# Altium PCB DB31.PcbDoc (part 3 of 8)
Units mil, origin at the board's own origin, x right, y up, seen from the top; angles counter-clockwise.
Board outline 3236.22 x 4456.69 mil, 8 copper layers (Top Layer, MidLayer1, MidLayer2, GND-Layer5, MidLayer3, VCC, MidLayer4, Bottom Layer), stack 61.8 mil thick; 226 components, 469 nets, 1815 pads, 1562 vias.
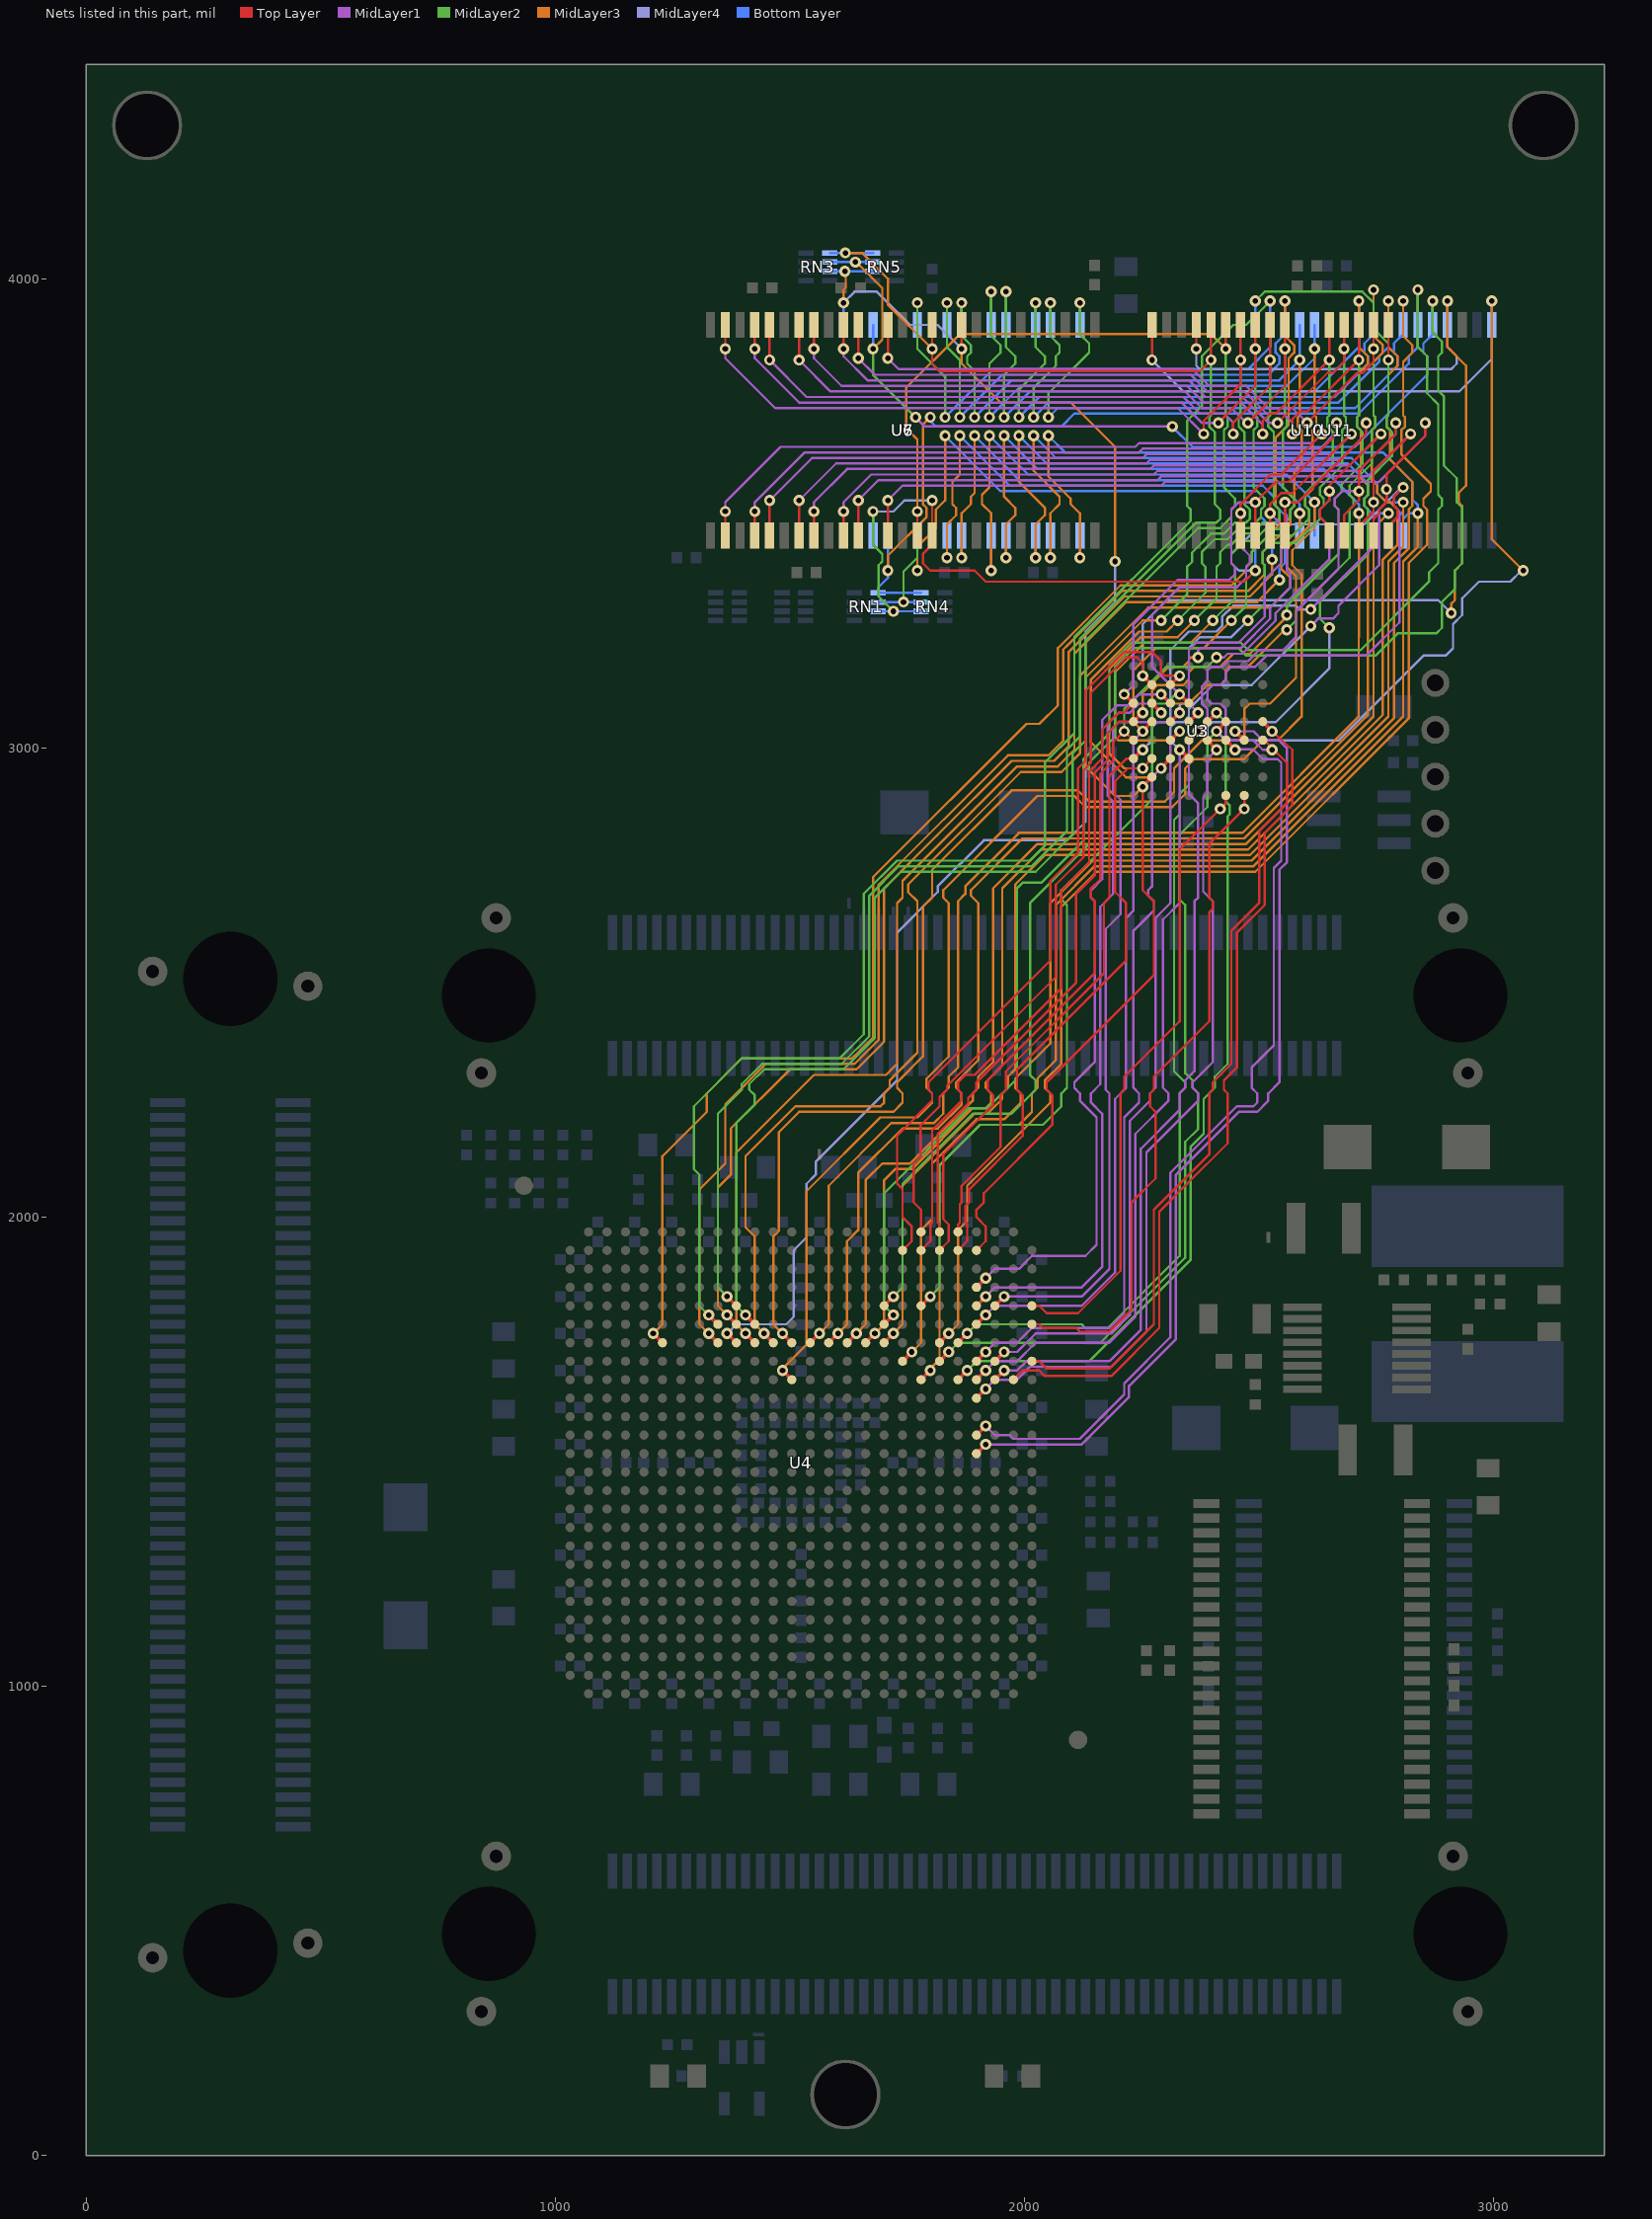
[diagram p9: the nets of this part, all layers, seen from the top]

## Via types
v1: diameter 23.62, hole 11.81, Top Layer to Bottom Layer, 947 vias
v2: diameter 23.62, hole 11.81, Top Layer to Bottom Layer, tented both sides, 476 vias
v3: diameter 27.56, hole 15.75, Top Layer to Bottom Layer, 138 vias
v4: diameter 23.62, hole 11.81, Top Layer to Bottom Layer, tented top, 1 vias

## Nets (pads, with @x,y where several pads share a name; then routed paths per layer and width w, separated by ;. In a path a pad name is that pad's centre, name@x,y a point inside that pad or via, vN(x,y) a via of type N, cw(c..) or ccw(c..) an arc to the next point about the centre after c; other vN are vias at no path point) (continued)
BUS_A19: U3.C4 U4.H21 U10.44 U11.44 | length 4321.2
  Top Layer w5: v2(2271.65,3826.77) U10.44@2271.65,3901.57
  Top Layer w7.87: U4.H21@1818.9,1692.91 v1(1838.59,1712.6) ; v1(2409.45,3035.43) U3.C4@2429.13,3056.1
  MidLayer2 w5: v1(1838.59,1712.6) 1858.27,1732.28 2078.74,1732.28 2090.55,1732.28 2161.42,1732.28 2342.52,1913.39 2342.52,2160.43 2370.08,2187.99 2370.08,2263.78 2358.27,2275.59 2358.27,2291.34 2342.52,2307.09 2342.52,2665.35 2330.71,2677.17 2330.71,2814.96 2389.76,2874.02 2389.76,3015.75 v1(2409.45,3035.43)
  MidLayer3 w5: v2(2996.06,3952.76) 2996.06,3633.86 2996.06,3444.88 v1(3062.99,3377.95)
  MidLayer4 w5: v2(2271.65,3826.77) 2338.58,3759.84 2926.67,3759.84 2996.06,3829.23 v2(2996.06,3952.76) ; v1(2409.45,3035.43) 2429.13,3015.75 2669.29,3015.75 2850.39,3196.85 2897.64,3196.85 2913.39,3212.6 2913.39,3263.78 2933.07,3283.46 2933.07,3318.9 2968.5,3354.33 3035.43,3354.33 3059.06,3377.95 v1(3062.99,3377.95)
  Bottom Layer w5: U11.44@2996.06,3901.57 v2(2996.06,3952.76)
BUS_A20: U3.D5 U4.K23 U10.28 U11.28 | length 3419.2
  Top Layer w5: v2(2775.59,3826.77) U10.28@2775.59,3901.57
  Top Layer w7.87: U4.K23@1897.64,1614.17 v1(1917.33,1633.86) ; U3.D5@2389.76,3016.73 v1(2409.45,2996.06)
  MidLayer1 w5: v1(1917.33,1633.86) 1937.01,1653.54 1984.25,1653.54 2011.81,1681.1 2078.74,1681.1 2090.55,1681.1 2185.04,1681.1 2259.84,1755.91 2259.84,2137.8 2370.08,2248.03 2370.08,2263.78 2358.27,2275.59 2358.27,2287.4 2401.57,2330.71 2401.57,2673.23 2380.91,2693.9 2380.91,2894.69 2389.76,2903.54 2389.76,2976.38 v1(2409.45,2996.06)
  MidLayer2 w5: v2(2492.13,3952.76) 2511.81,3972.44 2720.47,3972.44 2744.09,3948.82 2744.09,3893.7 2775.59,3862.21 v2(2775.59,3826.77) 2775.59,3708.66 2771.65,3704.72 2771.65,3685.04 2783.46,3673.23 2783.46,3622.05 2732.28,3570.87 2732.28,3539.37 2724.41,3531.5 2724.41,3515.75 2732.28,3507.87 2732.28,3413.39 2629.92,3311.02 2629.92,3275.59 v1(2649.61,3255.91)
  MidLayer4 w5: v1(2409.45,2996.06) 2389.76,3015.75 2389.76,3043.31 2401.57,3055.12 2535.43,3055.12 2649.61,3169.29 v1(2649.61,3255.91)
  Bottom Layer w5: U11.28@2492.13,3901.57 v2(2492.13,3952.76)
BUS_A21: U3.D4 U4.J22 | length 1840.2
  Top Layer w7.87: U4.J22@1858.27,1653.54 v1(1877.96,1673.23) ; U3.D4@2389.76,3056.1 v1(2409.45,3074.8)
  MidLayer2 w5: v1(1877.96,1673.23) 1897.64,1692.91 2078.74,1692.91 2090.55,1692.91 2137.8,1692.91 2354.33,1909.45 2354.33,2150.59 2381.89,2178.15 2381.89,2251.97 2405.51,2275.59 2405.51,2299.21 2433.07,2326.77 2433.07,2749.01 2433.07,2854.33 2437.01,2858.27 2437.01,2877.95 2429.13,2885.83 2429.13,2909.45 2429.13,3055.12 v1(2409.45,3074.8)
BUS_A22: U3.C5 U4.M23 | length 2028.4
  Top Layer w7.87: U4.M23@1897.64,1535.43 v1(1917.33,1555.12) ; U3.C5@2429.13,3016.73 v1@2448.82,2997.05
  MidLayer1 w5: v1(1917.33,1555.12) 1937.01,1535.43 1968.5,1535.43 1976.38,1527.56 2078.74,1527.56 2090.55,1527.56 2118.11,1527.56 2212.6,1622.05 2212.6,1645.67 2311.02,1744.09 2311.02,2094.49 2452.76,2236.22 2488.19,2236.22 2496.06,2244.09 2496.06,2263.78 2484.25,2275.59 2484.25,2318.9 2531.5,2366.14 2531.5,2744.09 2547.24,2759.84 2547.24,2968.5 2539.37,2976.38 2507.87,2976.38 2487.2,2997.05 v1@2448.82,2997.05
  Bottom Layer w5: v1@2447.83,2997.05 v1@2448.82,2997.05
  other v1: 2448.82,2996.06
BUS_A23: U3.B8 U4.F26 | length 1465
  Top Layer w5: U4.F26@2015.75,1771.65 2031.5,1771.65 2039.37,1763.78 2078.74,1763.78 2102.36,1763.78 2110.24,1763.78 2118.11,1755.91 2181.1,1755.91 2228.35,1803.15 2228.35,2031.5 2279.53,2082.68 2279.53,2224.41 2267.72,2236.22 2267.72,2263.78 2275.59,2271.65 2275.59,2299.21 2393.7,2417.32 2393.7,2649.61 2401.57,2657.48 2401.57,2673.23 2393.7,2681.1 2393.7,2731.56 ; 2393.7,2716.54 2393.7,2795.28 v1(2468.51,2870.08) U3.B8@2468.5,2898.62
BUS_A24: U3.C8 U4.E26 | length 1338.8
  Top Layer w5: U4.E26@2015.75,1811.02 2031.5,1811.02 2047.24,1795.28 2078.74,1795.28 2090.06,1795.28 2114.17,1795.28 2204.72,1885.83 2204.72,2263.78 2212.6,2271.65 2212.6,2299.21 2330.71,2417.32 2330.71,2783.46 v1(2417.32,2870.08) 2429.14,2881.89 U3.C8@2429.13,2898.62
BUS_D0: U3.E3 U4.E20 U6.2 U10.7 | length 3960.5
  Top Layer w5: U6.2@1362.21,3452.76 v2(1362.2,3503.93) ; U10.7@2460.63,3452.76 v1(2460.63,3500) 2460.63,3519.69 2523.62,3582.68 2547.24,3582.68 v2(2633.86,3669.29)
  Top Layer w7.87: U4.E20@1779.53,1811.02 v1(1799.21,1830.71) ; v1(2330.71,3114.17) U3.E3@2350.4,3095.48
  MidLayer1 w5: v2(1362.2,3503.93) 1362.2,3523.62 1480.31,3641.73 2236.22,3641.73 2244.09,3649.61 2614.17,3649.61 v2(2633.86,3669.29) ; v1(2330.71,3114.17) 2271.65,3173.23 2271.65,3283.46 2330.71,3342.52 2452.76,3342.52 2472.44,3362.2 2472.44,3385.83 2480.31,3393.7 2480.31,3409.45 2460.63,3429.13 v1(2460.63,3500)
  MidLayer2 w5: v1(1799.21,1830.71) 1818.9,1850.39 1818.9,2031.5 1818.9,2039.37 1818.9,2110.24 1905.51,2196.85 2039.37,2196.85 2078.74,2236.22 2078.74,2263.78 2090.55,2275.59 2090.55,2665.35 2078.74,2677.17 2078.74,2696.85 2094.49,2712.6 ; 2084.64,2702.76 2271.65,2889.77 2271.65,3086.61 2279.53,3094.49 2302.17,3094.49 2321.85,3114.17 v1(2330.71,3114.17)
BUS_D1: U3.H3 U4.B20 U6.4 U10.8 | length 3743.3
  Top Layer w5: U6.4@1425.2,3452.76 v2(1425.19,3503.93) ; U4.B20@1779.53,1929.13 1799.21,1948.82 1799.21,1984.25 1803.15,1988.19 1803.15,2031.5 1803.15,2039.37 1803.15,2185.04 1866.14,2248.03 1866.14,2263.78 1858.27,2271.65 1858.27,2287.4 1874.02,2303.15 1893.7,2303.15 2078.74,2488.19 2078.74,2696.85 2137.8,2755.91 2137.8,2949.54 2165.35,2977.1 2165.35,3039.37 2201.28,3075.3 2212.1,3075.3 U3.H3@2232.29,3095.48 ; U10.8@2492.13,3452.76 v1(2492.13,3523.62) 2535.43,3566.93 2562.99,3566.93 2665.35,3669.29 v2(2665.35,3692.91)
  Top Layer w7.87: v1(2212.6,3114.17) U3.H3@2232.29,3095.48
  MidLayer1 w5: v2(1425.19,3503.93) 1425.19,3523.62 1531.5,3629.92 2244.09,3629.92 2251.97,3637.8 2629.92,3637.8 2665.35,3673.23 v2(2665.35,3692.91) ; v1(2212.6,3114.17) 2232.28,3133.86 2232.28,3263.78 2326.77,3358.27 2437.01,3358.27 2448.82,3370.08 2448.82,3385.83 2440.94,3393.7 2440.94,3507.87 2456.69,3523.62 v1(2492.13,3523.62)
BUS_D2: U3.E4 U4.G22 U6.5 U10.9 | length 4029.6
  Top Layer w5: U6.5@1456.69,3452.76 v2(1456.69,3527.55) ; U10.9@2523.62,3452.76 v1(2523.62,3500) 2523.62,3519.69 2547.24,3543.31 2570.87,3543.31 v2(2696.85,3669.29)
  Top Layer w7.87: U4.G22@1858.27,1732.28 v1(1877.95,1751.97) ; U3.E4@2350.39,3056.1 v1(2370.08,3074.81)
  MidLayer1 w5: v2(1456.69,3527.55) 1547.24,3618.11 2251.97,3618.11 2259.84,3625.98 2653.54,3625.98 v2(2696.85,3669.29) ; v1(2370.08,3074.81) 2350.39,3094.5 2350.39,3208.66 2366.14,3224.41 2456.69,3224.41 2511.81,3279.53 2511.81,3358.27 2547.24,3393.7 2547.24,3476.38 v1(2523.62,3500)
  MidLayer2 w5: v1(1877.95,1751.97) 1897.64,1771.65 2082.68,1771.65 2090.55,1771.65 2122.05,1771.65 2129.92,1763.78 2177.17,1763.78 2330.71,1917.32 2330.71,2263.78 2342.52,2275.59 2342.52,2287.4 2318.9,2311.02 2318.9,2846.46 2330.71,2858.27 2330.71,2901.57 2350.39,2921.26 2350.39,3055.12 v1(2370.08,3074.81)
BUS_D3: U3.H4 U4.A21 U6.7 U10.10 | length 3663.5
  Top Layer w5: U6.7@1519.69,3452.76 v2(1519.68,3527.56) ; U4.A21@1818.9,1968.5 1818.9,1984.25 1814.96,1988.19 1814.96,2031.5 1814.96,2039.37 1814.96,2177.17 1879.92,2242.13 1879.92,2253.94 1897.64,2271.65 1897.64,2287.4 2110.24,2500 2110.24,2688.98 2149.61,2728.35 2149.61,2947.21 2177.17,2974.77 2177.17,3031.5 2201.78,3056.11 U3.H4@2232.28,3056.1 ; U10.10@2555.12,3452.76 v1(2555.12,3523.62) 2582.68,3523.62 2640.75,3581.69 2728.35,3669.29 v2(2728.35,3692.91)
  Top Layer w7.87: U3.H4@2232.28,3056.1 v1@2251.47,3075.3
  MidLayer1 w5: v2(1519.68,3527.56) 1598.43,3606.3 2259.84,3606.3 2267.72,3614.17 2673.23,3614.17 2728.35,3669.29 v2(2728.35,3692.91) ; v1(2370.08,3192.91) 2370.08,3208.66 2374.02,3212.6 2460.63,3212.6 2523.62,3275.59 2523.62,3299.21 2566.93,3342.52 2566.93,3370.08 2559.06,3377.95 2559.06,3496.06 2555.12,3500 v1(2555.12,3523.62)
  MidLayer3 w5: v1(2251.97,3074.8) 2251.97,3118.11 2255.91,3122.05 2307.09,3173.23 2338.58,3173.23 2350.39,3185.04 2350.39,3188.98 2354.33,3192.91 v1(2370.08,3192.91)
BUS_D4: U3.H5 U4.B21 U6.8 U10.13 | length 3728.5
  Top Layer w5: U6.8@1551.18,3452.76 v2(1551.18,3503.94) ; U4.B21@1818.9,1929.13 1838.58,1948.82 1838.58,1984.25 1826.77,1996.06 1826.77,2031.5 1826.77,2039.37 1826.77,2133.86 1933.07,2240.16 1933.07,2259.84 1921.26,2271.65 1921.26,2291.34 2149.61,2519.69 2149.61,2673.23 2141.73,2681.1 2141.73,2700.79 2161.42,2720.47 2161.42,2944.88 2188.98,2972.44 2188.98,3011.81 v1(2212.6,3035.43) U3.H5@2232.28,3016.73 ; U10.13@2649.61,3452.76 2649.61,3472.44 2629.92,3492.13 2629.92,3507.87 2649.61,3527.56 v1(2649.61,3547.24) 2649.61,3559.06 v2(2759.84,3669.29)
  MidLayer1 w5: v2(1551.18,3503.94) 1551.18,3523.62 1622.05,3594.49 2267.72,3594.49 2275.59,3602.36 2692.91,3602.36 v2(2759.84,3669.29) ; v1(2409.45,3192.91) 2425.2,3192.91 2433.07,3200.79 2464.57,3200.79 2535.43,3271.65 2535.43,3287.4 2649.61,3401.57 2649.61,3472.44 2629.92,3492.13 2629.92,3507.87 2649.61,3527.56 v1(2649.61,3547.24)
  MidLayer2 w5: v1(2212.6,3035.43) 2212.6,3082.68 2303.15,3173.23 2389.76,3173.23 v1(2409.45,3192.91)
BUS_D5: U3.E5 U4.J24 U6.10 U10.14 | length 4118.2
  Top Layer w5: U6.10@1614.17,3452.76 v2(1614.17,3503.93) ; U10.14@2681.1,3452.76 2681.1,3496.06 2712.6,3527.56 v1(2712.6,3547.24) 2712.6,3590.55 2791.34,3669.29 v2(2791.34,3692.91)
  Top Layer w7.87: U4.J24@1937.01,1653.54 v1(1956.7,1673.23) ; U3.E5@2350.39,3016.73 v1(2370.08,3035.43)
  MidLayer1 w5: v2(1614.17,3503.93) 1614.17,3523.62 1673.23,3582.68 2275.59,3582.68 2283.46,3590.55 2712.6,3590.55 2791.34,3669.29 v2(2791.34,3692.91) ; v1(1956.7,1673.23) 1984.25,1673.23 2003.94,1692.91 2078.74,1692.91 2090.55,1692.91 2181.1,1692.91 2248.03,1759.84 2248.03,2145.67 2330.71,2228.35 2330.71,2263.78 2342.52,2275.59 2342.52,2291.34 2362.2,2311.02 2362.2,2673.23 2370.08,2681.1 2370.08,2720.47 ; 2370.08,2704.72 2370.08,2720.47 ; v1(2712.6,3547.24) 2677.17,3547.24 2661.42,3531.5 2661.42,3515.75 2669.29,3507.87 2669.29,3381.89 2578.74,3291.34 2578.74,3236.22 2551.18,3208.66 2500,3208.66 2476.38,3185.04 2433.07,3185.04 2421.26,3173.23 2397.64,3173.23 2389.76,3165.35 2389.76,3141.73 2377.95,3129.92 2377.95,3094.49 2389.76,3082.68 2389.76,3055.12 v1(2370.08,3035.43) 2350.39,3015.75 2350.39,2901.57 2370.08,2881.89 2370.08,2720.47
BUS_D6: U3.H6 U4.A22 U6.11 U10.15 | length 3658.7
  Top Layer w5: U6.11@1645.67,3452.76 v2(1645.66,3527.55) ; U4.A22@1858.27,1968.5 1858.27,1984.25 1862.2,1988.19 1862.2,2027.56 1866.14,2031.5 1866.14,2039.37 1866.14,2066.93 1948.82,2149.6 1948.82,2259.84 1960.63,2271.65 1960.63,2311.02 2169.29,2519.69 2169.29,2669.29 2181.1,2681.1 2181.1,2940.94 2217.52,2977.37 U3.H6@2232.28,2977.36 ; U10.15@2712.6,3452.76 2712.6,3472.44 2744.09,3503.94 v1(2744.09,3523.62) 2744.09,3590.55 v2(2822.83,3669.29)
  Top Layer w7.87: U3.H6@2232.28,2977.36 2251.47,2996.56 v1@2251.97,2997.05
  MidLayer1 w5: v2(1645.66,3527.55) 1688.98,3570.87 2283.46,3570.87 2291.34,3578.74 2732.28,3578.74 v2(2822.83,3669.29) ; v1(2610.24,3295.28) 2744.09,3429.13 v1(2744.09,3523.62)
  MidLayer4 w5: v1(2251.97,2996.06) 2271.65,3015.75 2271.65,3043.31 2283.46,3055.12 2303.15,3055.12 2311.02,3062.99 2311.02,3208.66 2350.39,3248.03 2409.45,3248.03 2421.26,3259.84 2421.26,3279.53 2444.88,3303.15 2578.74,3303.15 2586.61,3295.28 v1(2610.24,3295.28)
BUS_D7: U3.E6 U4.J23 U6.13 U10.16 | length 4121.2
  Top Layer w5: U6.13@1708.66,3452.76 v2(1708.66,3527.55) ; U10.16@2744.09,3452.76 2744.09,3488.19 2755.91,3500 2755.91,3507.87 2771.65,3523.62 v1(2771.65,3551.18) 2771.65,3582.68 2854.33,3665.35 v2(2854.33,3692.91)
  Top Layer w7.87: U4.J23@1897.64,1653.54 v1(1917.33,1673.23) ; v1@2330.71,2997.05 2331.2,2996.56 U3.E6@2350.39,2977.36
  MidLayer1 w5: v2(1708.66,3527.55) 1740.16,3559.06 2291.34,3559.06 2299.21,3566.93 2755.91,3566.93 2854.33,3665.35 v2(2854.33,3692.91) ; v1(1917.33,1673.23) 1937.01,1692.91 1984.25,1692.91 2023.62,1732.28 2078.74,1732.28 2090.55,1732.28 2181.1,1732.28 2236.22,1787.4 2236.22,2177.17 2307.09,2248.03 2307.09,2263.78 2295.28,2275.59 2295.27,2633.86 2330.71,2669.29 2330.71,2700.79 ; 2330.71,2681.1 v1(2330.71,2996.06) v1@2330.71,2997.05 ; v1(2610.24,3259.84) 2625.98,3275.59 2657.48,3275.59 2669.29,3287.4 2669.29,3303.15 2755.91,3389.76 2755.91,3507.87 2771.65,3523.62 v1(2771.65,3551.18)
  MidLayer4 w5: v1(2330.71,2996.06) 2311.02,3015.75 2311.02,3043.31 2322.83,3055.12 2338.58,3055.12 2350.39,3066.93 2350.39,3082.68 2401.57,3133.86 2484.25,3133.86 v1(2610.24,3259.84)
BUS_D8: U3.F3 U4.D23 U6.42 U10.29 | length 3972.1
  Top Layer w5: v2(1708.66,3830.71) U6.42@1708.66,3901.57 ; v2(2602.36,3692.91) 2708.17,3798.72 2719.98,3798.72 2744.09,3822.83 v2(2744.09,3850.39) U10.29@2744.09,3901.57
  Top Layer w7.87: U4.D23@1897.64,1850.39 v1(1917.33,1870.08) ; v1@2291.34,3115.16 2291.83,3114.67 U3.F3@2311.03,3095.48
  MidLayer1 w5: v2(1708.66,3830.71) 1732.28,3807.09 2358.27,3807.09 2393.7,3771.65 2472.44,3771.65 2519.69,3724.41 2570.87,3724.41 v2(2602.36,3692.91) ; v1(1917.33,1870.08) 1937.01,1889.76 1988.19,1889.76 2015.75,1917.32 2078.74,1917.32 2090.55,1917.32 2129.92,1917.32 2153.54,1940.94 2153.54,2212.6 2118.11,2248.03 2118.11,2263.78 2106.3,2275.59 2106.3,2287.4 2149.61,2330.71 2149.61,2645.67 2149.61,2673.23 2141.73,2681.1 2141.73,2696.85 2165.35,2720.47 2165.35,3059.06 2196.85,3090.55 2220.47,3090.55 2244.09,3114.17 v1(2291.34,3114.17)
  MidLayer2 w5: v1(2559.06,3251.97) 2578.74,3271.65 2578.74,3291.34 2692.91,3405.51 2692.91,3507.87 2700.79,3515.75 2700.79,3531.5 2692.91,3539.37 2692.91,3559.06 2740.16,3606.3 2740.16,3677.17 2748.03,3685.04 2748.03,3704.72 2744.09,3708.66 v2(2744.09,3850.39)
  MidLayer3 w5: v1(2291.34,3114.17) 2311.02,3094.49 2350.39,3094.49 2389.76,3133.86 2417.32,3133.86 2429.13,3145.67 2429.13,3165.35 2437.01,3173.23 2476.38,3173.23 2555.12,3251.97 v1(2559.06,3251.97)
BUS_D9: U3.G3 U4.E23 U6.44 U10.30 | length 4107.5
  Top Layer w5: v2(1645.67,3830.71) U6.44@1645.67,3901.57 ; v2(2570.87,3669.29) 2570.87,3700.79 2586.61,3716.54 2602.36,3716.54 v2(2712.6,3826.77) U10.30@2712.6,3901.57
  Top Layer w7.87: U4.E23@1897.64,1811.02 v1(1917.33,1830.71) ; U3.G3@2271.65,3095.48 v1(2291.34,3074.8)
  MidLayer1 w5: v2(1645.67,3830.71) 1681.1,3795.28 2354.33,3795.28 2389.76,3759.84 2469,3759.84 2516.24,3712.6 2551.18,3712.6 2570.87,3692.91 v2(2570.87,3669.29) ; v1(1917.33,1830.71) 1937.01,1850.39 2078.74,1850.39 2090.55,1850.39 2122.05,1850.39 2165.35,1893.7 2165.35,2220.47 2141.73,2244.09 2141.73,2263.78 2161.42,2283.46 2161.42,2661.42 2188.98,2688.98 2188.98,2724.41 ; 2188.98,2700.79 2188.98,2885.83 2177.17,2897.64 2177.17,3051.18 2200.79,3074.8 2224.41,3074.8 2244.09,3094.49 2271.65,3094.49 v1(2291.34,3074.8)
  MidLayer2 w5: v1(2559.06,3283.46) 2559.06,3303.15 2669.29,3413.39 2669.29,3507.87 2661.42,3515.75 2661.42,3531.5 2676.18,3546.26 2676.18,3562.01 2720.47,3606.3 2720.47,3673.23 2708.66,3685.04 2708.66,3704.72 2712.6,3708.66 v2(2712.6,3826.77)
  MidLayer3 w5: v1(2291.34,3074.8) 2271.65,3094.49 2271.65,3122.05 2283.46,3133.86 2338.58,3133.86 2350.39,3145.67 2350.39,3161.42 2362.2,3173.23 2417.32,3173.23 2444.88,3200.79 2480.31,3200.79 2559.06,3279.53 v1(2559.06,3283.46)
BUS_D10: U3.F4 U4.E24 U6.45 U10.31 | length 3968.9
  Top Layer w5: v2(1614.17,3850.39) U6.45@1614.17,3901.57 ; v2@2537.4,3694.88 2539.37,3694.88 2541.34,3694.88 2646.65,3800.2 2658.46,3800.2 2681.1,3822.83 v2(2681.1,3850.39) U10.31@2681.1,3901.57
  Top Layer w7.87: U4.E24@1937.01,1811.02 v1(1956.7,1830.71) ; U3.F4@2311.02,3056.1 v1(2330.71,3074.8)
  MidLayer1 w5: v2(1614.17,3850.39) 1614.17,3834.65 1665.35,3783.46 2350.39,3783.46 2385.83,3748.03 2464.57,3748.03 2519.69,3692.91 v2(2539.37,3692.91) ; v1(1956.7,1830.71) 2078.74,1830.71 2090.55,1830.71 2122.05,1830.71 2181.1,1889.76 2181.1,2263.78 2173.23,2271.66 2173.23,2614.17 2204.72,2645.67 2204.72,2889.76 2188.98,2905.51 2188.98,3043.31 2200.79,3055.12 2311.02,3055.12 v1(2330.71,3074.8)
  MidLayer2 w5: v1(2476.38,3271.65) 2511.81,3307.09 2511.81,3389.76 2507.87,3393.7 2507.87,3417.32 2527.56,3437.01 2578.74,3437.01 2629.92,3488.19 2629.92,3507.87 2637.8,3515.75 2637.8,3531.5 2629.92,3539.37 2629.92,3555.12 2677.16,3602.36 2677.16,3677.17 2685.04,3685.04 2685.04,3704.72 2681.1,3708.66 v2(2681.1,3850.39)
  MidLayer4 w5: v1(2330.71,3074.8) 2330.71,3090.55 2334.65,3094.49 2342.52,3094.49 2350.39,3102.36 2350.39,3212.6 2374.02,3236.22 2440.94,3236.22 v1(2476.38,3271.65)
BUS_D11: U3.G4 U4.F23 U6.47 U10.32 | length 4029.9
  Top Layer w5: v2(1551.18,3850.39) U6.47@1551.18,3901.57 ; v2(2507.87,3669.29) 2507.87,3696.85 2523.62,3712.6 2535.43,3712.6 v2(2649.61,3826.77) U10.32@2649.61,3901.57
  Top Layer w7.87: U4.F23@1897.64,1771.65 v1(1917.33,1791.34) ; v1(2251.97,3035.43) U3.G4@2271.65,3056.1
  MidLayer1 w5: v2(1551.18,3850.39) 1551.18,3830.71 1610.24,3771.65 2346.46,3771.65 2381.89,3736.22 2460.63,3736.22 2507.87,3688.98 v2(2507.87,3669.29) ; v1(1917.33,1791.34) 1937.01,1811.02 1976.38,1811.02 2078.74,1811.02 2090.55,1811.02 2122.05,1811.02 2192.91,1881.89 2192.91,2251.97 2216.53,2275.59 2216.54,2637.8 2232.28,2653.54 2232.28,2669.29 2232.28,3015.75 v1(2251.97,3035.43)
  MidLayer2 w5: v1(2440.94,3271.65) 2472.44,3303.15 2472.44,3385.83 2484.25,3397.64 2484.25,3417.32 2519.69,3452.76 2570.87,3452.76 2606.3,3488.19 2606.3,3507.87 2598.43,3515.75 2598.43,3543.31 2657.48,3602.36 2657.48,3673.23 2645.67,3685.04 2645.67,3704.72 2649.61,3708.66 v2(2649.61,3826.77)
  MidLayer3 w5: v1(2251.97,3035.43) 2232.28,3055.12 2232.28,3165.35 2279.53,3212.6 2381.89,3212.6 v1(2440.94,3271.65)
BUS_D12: U3.F5 U4.H24 U6.48 U10.35 | length 4217.9
  Top Layer w5: v2(1519.68,3826.77) U6.48@1519.69,3901.57 ; v2(2476.38,3692.91) 2555.12,3771.65 v2(2555.12,3850.39) U10.35@2555.12,3901.57
  Top Layer w7.87: U4.H24@1937.01,1692.91 v1(1956.7,1712.6) ; U3.F5@2311.02,3016.73 v1(2330.71,3035.43)
  MidLayer1 w5: v2(1519.68,3826.77) 1586.6,3759.84 2342.52,3759.84 2377.95,3724.41 2440.94,3724.41 2472.44,3692.91 v2(2476.38,3692.91) ; v1(1956.7,1712.6) 1984.25,1712.6 2023.62,1751.97 2078.74,1751.97 2090.55,1751.97 2185.04,1751.97 2224.41,1791.34 2224.41,2204.72 2267.72,2248.03 2267.72,2263.78 2279.53,2275.59 2279.53,2637.79 2311.02,2669.29 2311.02,3015.75 v1(2330.71,3035.43) 2330.22,3035.93 v1@2326.78,3039.37
  MidLayer2 w5: v1(2401.57,3271.65) 2448.82,3318.9 2448.82,3385.83 2440.94,3393.7 2440.94,3413.39 2468.5,3440.94 2488.19,3440.94 2513.78,3466.54 2541.34,3466.54 2547.24,3472.44 2566.93,3492.13 2566.93,3507.87 2574.8,3515.75 2574.8,3531.5 2555.12,3551.18 2551.18,3555.12 2551.18,3677.17 2559.05,3685.04 2559.05,3704.72 2555.12,3708.66 v2(2555.12,3850.39)
  MidLayer3 w5: v1(2330.71,3035.43) 2311.02,3015.75 2200.79,3015.75 2192.91,3023.62 2192.91,3161.42 2255.91,3224.41 2354.33,3224.41 v1(2401.57,3271.65)
BUS_D13: U3.G6 U4.B22 U6.50 U10.36 | length 3854.6
  Top Layer w5: v2(1456.69,3826.77) U6.50@1456.69,3901.57 ; U4.B22@1858.27,1929.13 1877.95,1948.82 1877.95,1984.25 1874.02,1988.19 1874.02,2023.62 1881.89,2031.5 1881.89,2039.37 1881.89,2059.05 1996.06,2173.23 1996.06,2259.84 1984.25,2271.65 1984.25,2314.96 2216.54,2547.24 2216.54,2669.29 2192.91,2692.91 2192.91,2838.58 ; 2192.91,2822.83 2192.91,2929.14 2220.47,2956.69 v1(2251.97,2956.69) ; v1@2251.97,2957.68 U3.G6@2271.65,2977.36 ; v2(2444.88,3669.29) 2444.88,3692.91 2523.62,3771.65 v2(2523.62,3826.77) U10.36@2523.62,3901.57
  MidLayer1 w5: v2(1456.69,3826.77) 1535.43,3748.03 2338.58,3748.03 2374.02,3712.6 2425.2,3712.6 2444.88,3692.91 v2(2444.88,3669.29)
  MidLayer2 w5: v1(2362.2,3271.65) 2409.45,3318.9 2409.45,3385.83 2417.32,3393.7 2417.32,3417.32 2433.07,3433.07 2440.94,3433.07 2464.57,3456.69 2484.25,3456.69 2507.87,3480.32 2523.62,3480.32 2535.43,3480.31 2543.31,3488.19 2543.31,3507.87 2531.5,3519.69 2531.5,3673.23 2519.68,3685.04 2519.68,3704.72 2523.62,3708.66 v2(2523.62,3826.77)
  MidLayer3 w5: v1(2251.97,2956.69) 2212.6,2956.69 2181.1,2988.19 2181.1,3169.29 2248.03,3236.22 2326.77,3236.22 v1(2362.2,3271.65)
BUS_D14: U3.F6 U4.H23 U6.51 U10.37 | length 4224.3
  Top Layer w5: v2(1425.2,3850.39) U6.51@1425.2,3901.57 ; v2(2413.38,3692.91) 2492.13,3771.65 v2(2492.13,3850.39) U10.37@2492.13,3901.57
  Top Layer w7.87: U4.H23@1897.64,1692.91 v1(1917.33,1712.6) ; v1@2290.85,2957.19 U3.F6@2311.02,2977.36
  MidLayer1 w5: v2(1425.2,3850.39) 1425.2,3830.71 1519.69,3736.22 2334.65,3736.22 2377.95,3692.91 v2(2413.38,3692.91) ; v1(1917.33,1712.6) 1937.01,1732.28 1984.25,1732.28 2015.75,1763.78 2078.74,1763.78 2090.55,1763.78 2181.1,1763.78 2212.6,1795.28 2212.6,2212.6 2244.09,2244.09 2244.09,2263.78 2232.28,2275.59 2232.28,2610.24 2275.59,2653.54 2275.59,2673.23 2263.78,2685.04 2263.78,2696.85 2271.65,2704.72 2271.65,2937.01 v1(2291.34,2956.69) v1@2291.34,2957.68
  MidLayer2 w5: v1(2326.77,3271.65) 2385.83,3330.71 2385.83,3385.83 2377.95,3393.7 2377.95,3417.32 2405.51,3444.88 2433.07,3444.88 2456.69,3468.5 2480.31,3468.5 2503.94,3492.13 2503.94,3507.87 2511.81,3515.75 2511.81,3531.5 2492.13,3551.18 2488.19,3555.12 2488.19,3677.17 2496.06,3685.04 2496.06,3704.72 2492.13,3708.66 v2(2492.13,3850.39)
  MidLayer3 w5: v1(2291.34,2956.69) 2271.66,2937.01 2216.54,2937.01 2141.73,3011.81 2141.73,3145.67 2244.09,3248.03 2303.15,3248.03 v1(2326.77,3271.65)
BUS_D15: U3.G7 U4.B23 U6.53 U10.38 | length 3868
  Top Layer w5: v2(1362.2,3850.39) U6.53@1362.21,3901.57 ; U4.B23@1897.64,1929.13 1917.32,1948.82 1917.32,1980.32 1897.64,2000 1897.64,2015.75 1913.39,2031.5 1913.39,2039.37 1913.39,2051.18 2059.05,2196.85 2059.05,2259.84 2047.24,2271.65 2047.24,2287.4 2275.59,2515.75 2275.59,2673.23 2251.97,2696.85 2251.97,2819.14 ; 2251.97,2814.96 v1(2251.97,2917.32) v1@2251.97,2918.31 ; v2(2381.89,3669.29) 2381.89,3696.85 2460.63,3775.59 v2(2460.63,3826.77) U10.38@2460.63,3901.57
  Top Layer w7.87: v1@2251.97,2918.31 U3.G7@2271.65,2937.99
  MidLayer1 w5: v2(1362.2,3850.39) 1362.2,3830.71 1468.5,3724.41 2326.77,3724.41 v2(2381.89,3669.29)
  MidLayer2 w5: v1(2291.34,3271.65) 2346.46,3326.77 2346.46,3385.83 2357.28,3396.65 2357.28,3416.34 2397.64,3456.69 2425.2,3456.69 2448.82,3480.32 2472.44,3480.32 2480.31,3488.19 2480.31,3507.87 2468.5,3519.69 2468.5,3673.23 2456.69,3685.04 2456.69,3704.72 2460.63,3708.66 v2(2460.63,3826.77)
  MidLayer3 w5: v1(2251.97,2917.32) 2232.28,2897.64 2192.91,2897.64 2129.92,2960.63 2129.92,3149.61 2251.97,3271.65 v1(2291.34,3271.65)
BUS_D16: U4.J20 U7.2 U11.7 | length 3826.7
  Top Layer w7.87: U4.J20@1779.53,1653.54 v1(1799.22,1673.23)
  MidLayer3 w5: v1(1799.22,1673.23) 1799.22,1677.17 1818.9,1696.85 1818.9,2031.5 1818.9,2039.37 1818.9,2110.24 1905.51,2196.85 1988.19,2196.85 2015.75,2224.41 2015.75,2263.78 2027.56,2275.59 2027.56,2295.27 2066.93,2334.64 2066.93,2665.35 2149.61,2748.03 2488.19,2748.03 2807.09,3066.93 2807.09,3141.73 2807.09,3229.33 2807.09,3377.95 2807.09,3397.64 2838.58,3429.13 v2(2838.58,3500) ; v2(2051.18,3665.35) 2051.18,3578.74 2098.43,3531.5 2098.43,3519.68 2118.11,3500 v2(2118.11,3405.51)
  Bottom Layer w5: v2(2051.18,3665.35) 2086.61,3629.92 2763.78,3629.92 2826.77,3566.93 2826.77,3529.53 2838.58,3517.72 v2(2838.58,3500) 2818.9,3500 2807.09,3488.19 U11.7@2807.09,3452.76 ; v2(2118.11,3405.51) U7.2@2118.11,3452.76
BUS_D17: U4.G18 U7.4 U11.8 | length 3801.3
  Top Layer w7.87: U4.G18@1700.79,1732.28 v1(1720.47,1751.97)
  MidLayer3 w5: v1(1720.47,1751.97) 1740.16,1771.65 1740.16,2031.49 1740.16,2039.37 1740.16,2066.93 1893.7,2220.47 1921.26,2220.47 1952.76,2251.97 1952.76,2263.78 1964.57,2275.59 1964.57,2299.21 1980.31,2314.96 1980.31,2708.66 2043.31,2771.65 2480.31,2771.65 2775.59,3066.93 2775.59,3397.64 2807.09,3429.13 v2(2807.09,3523.62) ; v2(2019.68,3665.35) 2019.68,3590.55 2074.8,3535.43 2074.8,3519.68 2055.12,3500 v2(2055.12,3405.51)
  Bottom Layer w5: v2(2019.68,3665.35) 2066.93,3618.11 2696.85,3618.11 2751.97,3562.99 2751.97,3543.31 2771.65,3523.62 v2(2807.09,3523.62) 2807.09,3503.94 2775.59,3472.44 U11.8@2775.59,3452.76 ; v2(2055.12,3405.51) U7.4@2055.12,3452.76
BUS_D18: U4.G16 U7.5 U11.9 | length 3821
  Top Layer w7.87: U4.G16@1622.05,1732.28 v1(1641.73,1751.97)
  MidLayer3 w5: v1(1641.73,1751.97) 1661.42,1771.65 1661.42,2031.49 1661.42,2039.37 1661.42,2078.74 1696.85,2114.17 1755.91,2114.17 1889.76,2248.03 1889.76,2263.78 1901.57,2275.59 1901.57,2299.21 1933.07,2330.71 1933.07,2700.79 2027.56,2795.28 2472.44,2795.28 2744.09,3066.93 2744.09,3468.5 v2(2775.59,3500) ; v2(1988.19,3665.35) 1988.19,3566.93 2042.85,3512.27 2043.31,3512.27 2043.31,3496.06 2023.62,3476.38 v2(2023.62,3405.51)
  Bottom Layer w5: v2(1988.19,3665.35) 2047.24,3606.3 2688.98,3606.3 2732.28,3562.99 2732.28,3539.37 2724.41,3531.5 2724.41,3515.75 2740.16,3500 2744.09,3500 ; v2(2023.62,3405.51) U7.5@2023.62,3452.76 ; U11.9@2744.09,3452.76 2744.09,3500 ; v2(2775.59,3500) 2744.09,3500
BUS_D19: U4.G14 U7.7 U11.10 | length 3792.4
  Top Layer w7.87: U4.G14@1543.31,1732.28 v1(1562.99,1751.97)
  MidLayer3 w5: v1(1562.99,1751.97) 1582.68,1771.65 1582.68,2031.49 1582.68,2039.37 1582.68,2066.93 1716.54,2200.79 1807.09,2200.79 1826.77,2220.47 1826.77,2263.78 1838.58,2275.59 1838.58,2299.21 1858.27,2318.9 1858.27,2673.23 1874.02,2688.98 1874.02,2704.72 1988.19,2818.9 2464.57,2818.9 2712.6,3066.93 ; v2(1956.69,3665.35) 1956.69,3535.43 1980.31,3511.81 1980.31,3496.06 1960.63,3476.38 v2(1960.63,3405.51) ; 2712.46,3066.93 2712.57,3401.57 v2(2712.6,3500)
  Bottom Layer w5: v2(1956.69,3665.35) 2027.56,3594.49 2637.8,3594.49 2712.6,3519.69 v2(2712.6,3500) U11.10@2712.6,3452.76 ; v2(1960.63,3405.51) U7.7@1960.63,3452.76
BUS_D20: U4.J13 U7.8 U11.13 | length 3907.8
  Top Layer w7.87: v1(1484.25,1673.23) U4.J13@1503.94,1653.54
  MidLayer3 w5: v1@1484.25,1677.16 1535.43,1728.34 1535.43,2031.49 1535.43,2039.37 1535.43,2055.12 1692.91,2212.6 1771.65,2212.6 1803.15,2244.09 1803.15,2263.78 1791.34,2275.59 1791.34,2295.27 1838.58,2342.52 1838.58,2669.29 1826.77,2681.1 1826.77,2696.85 2027.56,2897.64 2106.3,2897.64 2129.92,2874.02 2314.96,2874.02 2342.52,2901.57 2342.52,2956.69 2362.2,2976.38 2468.5,2976.38 2507.87,3015.75 2539.37,3015.75 2590.55,3066.93 2590.55,3370.08 2570.87,3389.76 2570.87,3421.26 2618.11,3468.5 v2(2618.11,3523.62) ; v2(1925.2,3665.35) 1925.2,3555.12 1909.45,3539.37 1909.45,3519.68 1929.13,3500 v2(1929.13,3377.95)
  Bottom Layer w5: v2(1925.2,3665.35) 2007.87,3582.68 2559.06,3582.68 v2(2618.11,3523.62) 2618.11,3500 U11.13@2618.11,3452.76 ; v2(1929.13,3377.95) U7.8@1929.13,3452.76
BUS_D21: U4.G12 U7.10 U11.14 | length 3761.7
  Top Layer w7.87: v1(1444.88,1751.97) U4.G12@1464.57,1732.28
  MidLayer3 w5: v1(1444.88,1751.97) 1425.2,1771.66 1425.2,1836.62 1425.2,1958.66 1405.51,1978.35 1405.51,2031.5 1405.51,2039.37 1405.51,2129.92 1511.81,2236.22 1692.91,2236.22 1700.79,2244.09 1700.79,2263.78 1712.6,2275.59 1712.6,2291.34 1771.65,2350.39 1771.65,2673.23 1751.97,2692.91 1751.97,2708.66 1992.13,2948.82 2078.74,2948.82 2118.11,2988.19 2118.11,3153.54 2145.67,3181.1 2263.78,3299.21 2523.62,3299.21 2566.93,3342.52 2566.93,3362.2 2547.24,3381.89 2547.24,3429.13 2586.61,3468.5 v2(2586.61,3500) ; v2(1866.14,3405.51) 1866.14,3500 1885.83,3519.68 1885.83,3535.43 1893.7,3543.31 v2(1893.7,3665.35)
  Bottom Layer w5: v2(1866.14,3405.51) U7.10@1866.14,3452.76 ; v2(1893.7,3665.35) 1988.19,3570.87 2535.43,3570.87 2586.61,3519.69 v2(2586.61,3500) U11.14@2586.61,3452.76
BUS_D22: U4.G11 U7.11 U11.15 | length 3666.1
  Top Layer w7.87: v1(1405.51,1751.97) U4.G11@1425.2,1732.28
  MidLayer3 w5: v1(1405.51,1751.97) 1385.83,1771.66 1385.83,2031.5 1385.83,2039.37 1385.83,2137.8 1551.18,2303.15 1704.72,2303.15 1728.35,2326.77 1728.35,2669.29 1740.16,2681.1 1740.16,2716.54 1984.25,2960.63 2070.87,2960.63 2106.3,2996.06 2106.3,3200.79 2216.54,3311.02 2496.06,3311.02 v1(2543.31,3358.27) ; v2(1834.65,3405.51) 1834.65,3476.38 1854.33,3496.06 1854.33,3511.81 1846.46,3519.69 1846.46,3566.93 1862.2,3582.68 v2(1862.2,3665.35)
  Bottom Layer w5: v2(1834.65,3405.51) U7.11@1834.65,3452.76 ; v2(1862.2,3665.35) 1968.5,3559.06 2507.87,3559.06 2535.43,3531.5 2535.43,3515.75 2555.12,3496.06 U11.15@2555.12,3452.76 2555.12,3417.32 2555.12,3393.7 2543.31,3381.89 v1(2543.31,3358.27)
BUS_D23: U4.F10 U7.13 U11.16 | length 3706.6
  Top Layer w7.87: v1(1366.14,1791.34) U4.F10@1385.83,1771.65
  MidLayer3 w5: v1(1366.14,1791.34) 1346.46,1811.02 1346.46,2031.49 1346.46,2039.37 1346.46,2062.99 1374.02,2090.55 1374.02,2188.98 1500,2314.96 1641.73,2314.96 1700.79,2374.02 1700.79,2700.79 1812.99,2812.99 1972.44,2972.44 2062.99,2972.44 2094.49,3003.94 2094.49,3204.72 2212.6,3322.83 2480.31,3322.83 2527.56,3370.08 2527.56,3381.89 ; v2(1771.65,3377.95) 1771.65,3429.13 1811.02,3468.5 1811.02,3507.87 1830.71,3527.56 v2(1830.71,3665.35) ; 2527.56,3369.83 v2(2527.56,3401.57)
  Bottom Layer w5: v2(1771.65,3377.95) U7.13@1771.65,3452.76 ; v2(1830.71,3665.35) 1948.82,3547.24 2496.06,3547.24 2511.81,3531.5 2511.81,3515.75 2503.94,3507.87 2503.94,3492.13 2523.62,3472.44 U11.16@2523.62,3452.76 2527.56,3448.82 v2(2527.56,3401.57)
BUS_D24: U4.F9 U7.42 U11.29 | length 4190.7
  Top Layer w7.87: v1(1326.77,1791.34) U4.F9@1346.46,1771.65
  MidLayer2 w5: v1(1326.77,1791.34) 1307.09,1811.03 1307.09,2031.5 1307.09,2039.37 1307.09,2090.55 1295.28,2102.36 1295.28,2236.22 1397.64,2338.58 1606.3,2338.58 1657.48,2389.76 1657.48,2688.98 1728.35,2759.84 2011.81,2759.84 2043.31,2791.34 2043.31,2968.5 2106.3,3031.5 2106.3,3236.22 2354.33,3484.25 2354.33,3507.87 2346.46,3515.75 2346.46,3696.85 2377.95,3728.35 2377.95,3834.65 2444.88,3901.57 2472.77,3901.57 v2(2523.62,3952.42) ; v2(1771.65,3948.82) 1771.65,3850.39 1830.71,3791.34 v2(1830.71,3704.72)
  Bottom Layer w5: U7.42@1771.65,3901.57 v2(1771.65,3948.82) ; v2(1830.71,3704.72) 1933.07,3807.09 2476.38,3807.09 2523.62,3854.33 U11.29@2523.62,3901.57 v2(2523.62,3952.42)
BUS_D25: U4.G6 U7.44 U11.30 | length 4278.5
  Top Layer w7.87: v1(1208.66,1751.97) U4.G6@1228.35,1732.28
  MidLayer2 w5: v2(1834.65,3948.82) 1834.65,3854.33 1862.2,3826.77 v2(1862.2,3704.72)
  MidLayer3 w5: v1(1208.66,1751.97) 1228.35,1771.65 1228.35,2129.92 1322.83,2224.41 1322.83,2263.78 1397.64,2338.58 1633.86,2338.58 1677.17,2381.89 1677.17,2724.41 2003.94,3051.18 2031.5,3051.18 2070.87,3090.55 2070.87,3212.6 2204.72,3346.46 2440.94,3346.46 2472.44,3377.95 2472.44,3385.83 2484.25,3397.64 2484.25,3417.32 2490.16,3423.23 2543.31,3476.38 2543.31,3507.87 2535.43,3515.75 2535.43,3661.42 2562.99,3688.98 2562.99,3830.71 2574.8,3842.52 2574.8,3858.27 2555.12,3877.95 v2(2555.12,3952.76)
  Bottom Layer w5: U7.44@1834.65,3901.57 v2(1834.65,3948.82) ; v2(1862.2,3704.72) 1952.76,3795.28 2519.68,3795.28 2543.31,3818.9 2543.31,3834.65 2535.43,3842.52 2535.43,3862.2 2555.12,3881.89 v2(2555.12,3952.76)
BUS_D26: U4.G9 U7.45 U11.31 | length 4097
  Top Layer w7.87: v1(1326.77,1751.97) U4.G9@1346.46,1732.28
  MidLayer2 w5: v2(1866.14,3948.82) 1866.14,3877.95 1885.83,3858.27 1885.83,3842.52 1877.95,3834.65 1877.95,3818.9 1893.7,3803.15 v2(1893.7,3704.72)
  MidLayer3 w5: v1(1326.77,1751.97) 1307.09,1771.66 1307.09,2031.5 1307.09,2039.37 1307.09,2059.06 1362.2,2114.17 1362.2,2240.16 1448.82,2326.77 1637.8,2326.77 1688.98,2377.95 1688.98,2708.66 1964.57,2984.25 2051.18,2984.25 2082.68,3015.75 2082.68,3209.65 2089.57,3216.54 2207.68,3334.65 2476.38,3334.65 2511.81,3370.08 2511.81,3389.76 2507.87,3393.7 2507.87,3417.32 2566.93,3476.38 2566.93,3507.87 2574.8,3515.75 2574.8,3590.55 2590.55,3606.3 2590.55,3677.17 2582.68,3685.04 2582.68,3704.72 2586.61,3708.66 v2(2586.61,3826.77)
  Bottom Layer w5: U7.45@1866.14,3901.57 v2(1866.14,3948.82) ; v2(1893.7,3704.72) 1972.44,3783.46 2543.31,3783.46 v2(2586.61,3826.77) U11.31@2586.61,3901.57
BUS_D27: U4.G13 U7.47 U11.32 | length 4240.1
  Top Layer w7.87: v1(1484.25,1751.97) U4.G13@1503.94,1732.28
  MidLayer2 w5: v2(1925.2,3704.72) 1925.2,3818.9 1948.82,3842.52 1948.82,3858.27 1929.13,3877.95 v2(1929.13,3972.44)
  MidLayer3 w5: v1(1484.25,1751.97) 1464.57,1771.66 1464.57,1836.62 1464.57,1958.66 1476.38,1970.47 1476.38,2031.5 1476.38,2039.37 1476.38,2181.1 1519.68,2224.41 1720.47,2224.41 1740.16,2244.09 ; 1736.22,2240.16 1740.16,2244.09 ; v2(2618.11,3850.39) 2618.11,3708.66 2622.05,3704.72 2622.05,3685.04 2614.17,3677.17 2614.17,3551.18 2598.43,3535.43 2598.43,3515.75 2606.3,3507.87 2606.3,3472.44 2559.06,3425.2 2559.06,3385.83 2578.74,3366.14 2578.74,3149.61 2523.62,3094.49 2480.31,3094.49 2468.5,3082.68 2468.5,3027.56 2456.69,3015.75 2377.95,3015.75 2318.9,2956.69 2318.9,2905.51 2299.21,2885.83 2137.8,2885.83 2114.17,2909.45 1972.44,2909.45 1803.15,2740.16 1803.15,2681.1 1783.46,2661.42 1783.46,2342.52 1728.35,2287.4 1728.35,2275.59 1740.16,2263.78 1740.16,2244.09
  Bottom Layer w5: v2(1925.2,3704.72) 1992.13,3771.65 2559.05,3771.65 2618.11,3830.71 v2(2618.11,3850.39) U11.32@2618.11,3901.57 ; U7.47@1929.13,3901.57 v2(1929.13,3972.44)
BUS_D28: U4.G15 U7.48 U11.35 | length 4351.1
  Top Layer w7.87: U4.G15@1582.68,1732.28 v1(1602.36,1751.97)
  MidLayer2 w5: v2(1956.69,3704.72) 1956.69,3795.28 1980.31,3818.9 1980.31,3834.65 1960.63,3854.33 v2(1960.63,3972.44)
  MidLayer3 w5: v1(1602.36,1751.97) 1622.05,1771.66 1622.05,1948.82 1645.67,1972.44 1645.67,2031.5 1645.67,2039.37 1645.67,2094.49 1740.16,2188.98 1814.96,2188.98 1866.14,2240.16 1866.14,2263.78 1854.33,2275.59 1854.33,2287.4 1901.57,2334.65 1901.57,2669.29 1885.83,2685.04 1885.83,2696.85 1996.06,2807.09 2468.5,2807.09 2732.28,3070.87 2732.28,3507.87 2724.41,3515.75 2724.41,3531.49 2732.28,3539.37 2732.28,3559.06 2716.54,3574.8 2716.54,3677.17 2708.66,3685.04 2708.66,3704.72 2712.6,3708.66 2712.6,3799.21 2732.28,3818.9 2732.28,3834.65 2712.6,3854.33 v2(2712.6,3952.76)
  Bottom Layer w5: v2(1956.69,3704.72) 2011.81,3759.84 2618.11,3759.84 2712.6,3854.33 U11.35@2712.6,3901.57 v2(2712.6,3952.76) ; v2@1956.69,3972.44 v2(1960.63,3972.44) U7.48@1960.63,3901.57
BUS_D29: U4.G17 U7.50 U11.36 | length 4350
  Top Layer w7.87: U4.G17@1661.42,1732.28 v1(1681.1,1751.97)
  MidLayer2 w5: v2(1988.19,3704.72) 1988.19,3763.78 2043.31,3818.9 2043.31,3834.65 2023.62,3854.33 v2(2023.62,3948.82)
  MidLayer3 w5: v1(1681.1,1751.97) 1700.79,1771.65 1700.79,2031.5 1700.79,2039.37 1700.79,2078.74 1724.41,2102.36 1759.84,2102.36 1889.76,2232.28 1917.32,2232.28 1929.13,2244.09 1929.13,2263.78 1917.32,2275.59 1917.32,2287.4 1952.76,2322.83 1952.76,2700.79 2035.43,2783.46 2476.38,2783.46 2763.78,3070.87 2763.78,3401.57 2795.28,3433.07 2795.28,3507.87 2779.53,3523.62 2771.65,3523.62 2751.97,3543.31 2751.97,3559.06 2740.16,3570.87 2740.16,3677.17 2748.03,3685.04 2748.03,3704.72 2744.09,3708.66 2744.09,3822.83 2763.78,3842.52 2763.78,3858.27 2744.09,3877.95 v2(2744.09,3976.38)
  Bottom Layer w5: v2(1988.19,3704.72) 2031.5,3748.03 2661.42,3748.03 2732.28,3818.9 2732.28,3834.65 2724.41,3842.52 2724.41,3862.2 2744.09,3881.89 U11.36@2744.09,3901.57 v2(2744.09,3976.38) ; U7.50@2023.62,3901.57 v2(2023.62,3948.82)
BUS_D30: U4.H19 U7.51 U11.37 | length 4239
  Top Layer w7.87: U4.H19@1740.16,1692.91 v1(1759.84,1712.6)
  MidLayer2 w5: v2(2019.68,3704.72) 2019.68,3767.72 2066.93,3814.96 2066.93,3834.65 2074.8,3842.52 2074.8,3858.27 2055.12,3877.95 v2(2055.12,3948.82)
  MidLayer3 w5: v1(1759.84,1712.6) 1779.53,1732.28 1779.53,1972.44 1803.15,1996.06 1803.15,2031.5 1803.15,2039.37 1803.15,2114.17 1897.64,2208.66 1956.69,2208.66 1992.12,2244.09 1992.12,2263.78 1980.31,2275.59 1980.31,2295.27 2055.12,2370.08 2055.12,2669.29 2145.67,2759.84 2484.25,2759.84 2787.4,3062.99 2787.4,3393.7 2818.9,3425.2 2818.9,3507.87 2826.77,3515.75 2826.77,3566.93 2779.53,3614.17 2779.53,3677.17 2771.65,3685.04 2771.65,3704.72 2775.59,3708.66 2775.59,3795.28 2795.28,3814.96 2795.28,3834.65 2775.59,3854.33 v2(2775.59,3952.76)
  Bottom Layer w5: v2(2019.68,3704.72) 2051.18,3736.22 2669.29,3736.22 2755.9,3822.83 2755.9,3834.65 2775.59,3854.33 U11.37@2775.59,3901.57 v2(2775.59,3952.76) ; U7.51@2055.12,3901.57 v2(2055.12,3948.82)
BUS_D31: U4.G21 U7.53 U11.38 | length 4190.5
  Top Layer w7.87: U4.G21@1818.9,1732.28 v1(1838.58,1751.97)
  MidLayer2 w5: v2(2051.18,3704.72) 2051.18,3755.91 2137.8,3842.52 2137.8,3862.2 2118.11,3881.89 v2(2118.11,3948.82)
  MidLayer3 w5: v1(1838.58,1751.97) 1858.27,1771.65 1858.27,1972.44 1877.95,1992.13 1877.95,2031.5 1877.95,2039.37 1877.95,2066.93 1964.57,2153.54 2055.12,2244.09 2055.12,2263.78 2043.3,2275.59 2043.3,2291.34 2078.74,2326.77 2078.74,2661.42 2153.54,2736.22 2492.12,2736.22 2818.9,3062.99 2818.9,3393.7 2858.27,3433.07 2858.27,3507.87 2850.39,3515.75 2850.39,3531.5 2866.14,3547.24 2866.14,3562.99 2803.15,3625.98 2803.15,3677.17 2811.02,3685.04 2811.02,3704.72 2807.09,3708.66 2807.09,3822.83 2826.77,3842.52 2826.77,3858.27 2807.09,3877.95 v2(2807.09,3952.76)
  Bottom Layer w5: v2(2051.18,3704.72) 2070.87,3724.41 2704.72,3724.41 2795.28,3814.96 2795.28,3834.65 2787.4,3842.52 2787.4,3862.2 2807.09,3881.89 U11.38@2807.09,3901.57 v2(2807.09,3952.76) ; U7.53@2118.11,3901.57 v2(2118.11,3948.82)
BUS_FLASH_NBUSY: U3.A4 U4.J25 | length 1809.8
  Top Layer w5: U4.J25@1976.38,1653.54 1996.06,1673.23 2031.5,1673.23 2043.31,1661.42 2078.74,1661.42 2090.55,1661.42 2185.04,1661.42 2287.4,1763.78 2287.4,2011.81 2346.46,2070.87 2433.07,2157.48 2433.07,2263.78 2425.2,2271.65 2425.2,2291.34 2452.76,2318.9 2452.76,2606.3 2511.81,2665.35 2511.81,2818.9 2570.87,2877.95 2570.87,2996.07 v1(2527.56,3035.43)
  Top Layer w7.87: U3.A4@2507.87,3056.1 v1(2527.56,3035.43)
BUS_FLASH_NCS: U3.F2 U4.B19 | length 1685.2
  Top Layer w5: U4.B19@1740.16,1929.13 1759.84,1948.82 1759.84,1980.31 1740.16,2000 1740.16,2031.5 1740.16,2039.37 1740.16,2060.04 1728.35,2071.85 1728.35,2173.23 1803.15,2248.03 1803.15,2263.78 1795.27,2271.65 1795.27,2287.4 2055.12,2547.24 2055.12,2716.54 2114.17,2775.59 2114.17,2956.69 2129.92,2972.44 2129.92,3122.05 2212.6,3204.72 2271.65,3204.72 2291.34,3185.04 2291.34,3161.42 2299.21,3153.54 v1(2330.71,3153.54) ; U3.F2@2310.03,3134.85 U3.F2@2311.02,3134.84
  Top Layer w7.87: U3.F2@2311.02,3134.84 v1(2330.71,3153.54)
BUS_FLASH_NRESET: U3.B5 U4.N23 | length 2073
  Top Layer w7.87: U4.N23@1897.64,1496.06 v1(1917.33,1515.75) ; v1(2448.82,3035.43) U3.B5@2468.5,3016.73
  MidLayer1 w5: v1(1917.33,1515.75) 2078.74,1515.75 2090.55,1515.75 2122.05,1515.75 2222.93,1616.63 2222.93,1640.26 2322.83,1740.16 2322.83,2090.55 2456.69,2224.41 2496.06,2224.41 2519.68,2248.03 2519.68,2263.78 2543.31,2287.4 2543.31,2740.16 2559.06,2755.91 2559.06,3000 2543.31,3015.75 2507.87,3015.75 2488.19,3035.43 v1(2448.82,3035.43)
BUS_NBE0: RN1.6 RN4.7 U4.F11 U6.15 U10.39 | length 4268.9
  Top Layer w5: U6.15@1771.65,3452.75 v2(1771.65,3503.93) ; v2(2429.13,3850.39) U10.39@2429.13,3901.57
  Top Layer w7.87: v1(1405.51,1791.34) U4.F11@1425.2,1771.65
  MidLayer2 w5: v1(1405.51,1791.34) 1385.83,1811.02 1385.83,2031.49 1385.83,2039.37 1385.83,2200.79 1425.2,2240.16 1425.2,2259.84 1413.38,2271.65 1413.38,2283.46 1444.88,2314.96 1614.17,2314.96 1681.1,2381.89 1681.1,2681.1 1736.22,2736.22 2023.62,2736.22 2102.36,2814.96 2102.36,2988.19 2129.92,3015.75 2129.92,3228.35 2370.08,3468.5 2417.32,3468.5 2440.94,3492.13 2440.94,3507.87 2448.82,3515.75 2448.82,3531.5 2425.2,3555.12 2425.2,3677.17 2433.07,3685.04 2433.07,3704.72 2429.13,3708.66 v2(2429.13,3850.39) ; v1(1742.14,3311.02) 1742.14,3376 1771.65,3405.51 v2(1771.65,3503.93)
  MidLayer3 w5: v2(1771.65,3503.93) 1771.65,3657.49 1748.03,3681.1 1748.03,3767.72 1862.2,3881.89 2397.64,3881.89 v2(2429.13,3850.39)
  Bottom Layer w5: RN1.6@1688.58,3311.02 v1(1742.14,3311.02) RN4.7@1779.53,3311.02 RN4.7@1779.92,3311.02
BUS_NBE1: RN3.5 RN5.8 U4.E10 U6.39 U10.40 | length 3939.2
  Top Layer w5: U6.39@1803.14,3901.57 v2(1803.14,3850.39) 1803.14,3818.9 1818.89,3803.15 2374.02,3803.15 v2(2397.64,3826.77) U10.40@2397.64,3901.57
  Top Layer w7.87: v1(1366.14,1830.71) U4.E10@1385.83,1811.02
  MidLayer2 w5: v1(1366.14,1830.71) 1346.46,1850.39 1346.46,2031.5 1346.46,2039.37 1346.46,2220.47 1397.64,2271.65 1397.64,2283.47 1440.94,2326.77 1610.24,2326.77 1669.29,2385.83 1669.29,2685.04 1732.28,2748.03 2015.75,2748.03 2090.55,2822.83 2090.55,2996.06 2118.11,3023.62 2118.11,3232.28 2366.14,3480.32 2409.45,3480.32 2417.32,3488.19 2417.32,3507.87 2405.51,3519.68 2405.51,3673.23 2393.7,3685.04 2393.7,3704.72 2397.64,3708.66 v2(2397.64,3826.77)
  MidLayer3 w5: v1@1617.92,4055.11 v1(1618.11,4055.11) 1653.55,4055.11 1708.66,4000 1708.66,3944.88 v2(1803.14,3850.39)
  Bottom Layer w5: RN3.5@1586.22,4055.11 v1(1618.11,4055.11) RN5.8@1676.19,4055.12 RN5.8@1677.17,4055.11
BUS_NBE2: RN1.5 RN4.8 U4.F18 U7.15 U11.39 | length 4926.9
  Top Layer w7.87: U4.F18@1700.79,1771.65 v1(1720.47,1791.34)
  MidLayer2 w5: v1(1720.47,1791.34) 1700.79,1811.02 1700.79,2031.49 1700.79,2039.37 1700.79,2051.18 1881.89,2232.28 1921.26,2232.28 1984.25,2295.28 1984.25,2700.79 1996.06,2712.6 2035.43,2712.6 2125.98,2803.15 2125.98,2976.38 2181.1,3031.5 2181.1,3177.17 2228.35,3224.41 2460.63,3224.41 2476.38,3208.66 2716.54,3208.66 2862.2,3354.33 2862.2,3374.02 2881.89,3393.7 2881.89,3507.87 2889.76,3515.75 2889.76,3531.5 2881.89,3539.37 2881.89,3732.28 2858.27,3755.91 2858.27,3834.65 2838.58,3854.33 v2(2838.58,3976.38)
  MidLayer3 w5: v2(1708.66,3377.95) 1708.66,3409.45 1791.34,3492.13 1791.34,3511.81 1783.46,3519.68 1783.46,3688.98 v2(1799.21,3704.72)
  Bottom Layer w5: U7.15@1708.66,3452.76 v2(1708.66,3377.95) 1708.66,3362.2 1688.98,3342.52 1688.98,3331.1 1688.58,3330.71 RN4.8@1779.53,3330.71 ; v2@1799.21,3696.85 1811.02,3685.04 2078.74,3685.04 2106.3,3712.6 2712.6,3712.6 2818.9,3818.9 2818.9,3834.65 2838.58,3854.33 U11.39@2838.58,3901.57 v2(2838.58,3976.38)
BUS_NBE3: RN3.6 RN5.7 U4.E18 U7.39 U11.40 | length 5006.7
  Top Layer w7.87: U4.E18@1700.79,1811.02 v1(1720.47,1830.71)
  MidLayer1 w5: v2(1767.72,3704.72) 1787.4,3685.04 v2(2314.96,3685.04)
  MidLayer2 w5: v2(1677.17,3850.39) 1677.17,3795.28 v2(1767.72,3704.72) ; v1(1720.47,1830.71) 1740.16,1850.39 1740.16,2031.5 1740.16,2039.37 1740.16,2070.86 1889.76,2220.47 1972.44,2220.47 2023.62,2271.65 2023.62,2291.34 2011.81,2303.15 2011.81,2669.29 2137.8,2795.28 2137.8,2968.5 2192.91,3023.62 2192.91,3173.23 2232.28,3212.6 2456.69,3212.6 2472.44,3196.85 2748.03,3196.85 2795.28,3244.1 2877.95,3244.1 2889.76,3255.91 2889.76,3311.02 2917.32,3338.58 2917.32,3377.95 2933.07,3393.7 2933.07,3511.81 2921.26,3523.62 2921.26,3574.8 2893.7,3602.36 2893.7,3750 2881.89,3761.81 2881.89,3834.65 2889.76,3842.52 2889.76,3866.14 2870.08,3885.83 v2(2870.08,3952.76)
  MidLayer3 w5: v1@1641.54,4035.43 1696.85,3980.12 1696.85,3870.08 v2(1677.17,3850.39)
  Bottom Layer w5: RN3.6@1586.22,4035.43 v1(1639.78,4035.43) RN5.7@1676.19,4035.43 RN5.7@1677.56,4035.43 ; v2(1677.17,3850.39) U7.39@1677.17,3901.57 ; v2(2314.96,3685.04) 2358.27,3641.73 2704.72,3641.73 2858.27,3795.28 2858.27,3834.65 2850.39,3842.52 2850.39,3862.2 2870.08,3881.89 U11.40@2870.08,3901.57 v2(2870.08,3952.76)
BUS_NOE: U3.G2 U4.A20 U10.41 U11.41 | length 3861.8
  Top Layer w5: U4.A20@1779.53,1968.5 1779.53,2015.75 1763.78,2031.5 1763.78,2039.37 1763.78,2114.17 1778.54,2128.94 1778.54,2195.87 1818.9,2236.22 1818.9,2255.91 1834.64,2271.65 1834.64,2279.53 2066.93,2511.81 2066.93,2708.66 2125.98,2767.72 2125.98,2952.76 2141.73,2968.5 2141.73,3118.11 2216.54,3192.91 2240.16,3192.91 2251.97,3181.1 v1@2251.97,3154.53 ; v1@2255.91,3150.59 2255.91,3153.54 v1@2255.91,3154.53 ; v2(2366.14,3850.39) U10.41@2366.14,3901.57
  Top Layer w7.87: v1@2251.97,3154.53 2252.46,3154.04 2255.91,3150.59 U3.G2@2271.65,3134.84
  MidLayer3 w5: v2(2901.58,3952.76) 2901.57,3854.33 2940.94,3814.96 2940.94,3559.06 2925.2,3543.31 2925.2,3523.62 2933.07,3515.75 2933.07,3393.7 2917.32,3377.95 2917.32,3314.96 2909.45,3307.09 v1(2909.45,3287.4)
  MidLayer4 w5: v1(2251.97,3153.54) 2251.97,3263.78 2303.15,3314.96 2881.89,3314.96 v1(2909.45,3287.4) ; v2(2366.14,3850.39) 2366.14,3814.96 2374.02,3807.09 2909.45,3807.09 2921.26,3818.9 2921.26,3834.65 2901.58,3854.33 v2(2901.58,3952.76)
  Bottom Layer w5: U11.41@2901.57,3901.57 v2(2901.58,3952.76)
BUS_NWE: RN1.7 RN4.6 U3.A5 U4.H26 U6.16 U7.16 U10.17 U11.17 | length 4802.4
  Top Layer w5: U6.16@1803.14,3452.75 U6.16@1803.14,3460.63 ; v2(1803.14,3527.55) U6.16@1803.14,3460.63 ; U4.H26@2015.75,1692.91 2031.49,1692.91 2047.24,1677.17 2078.74,1677.17 2090.55,1677.17 2181.1,1677.17 2275.59,1771.65 2275.59,2015.75 2393.7,2133.86 2393.7,2263.78 2401.57,2271.65 2401.57,2287.4 2440.94,2326.77 2440.94,2610.24 2500,2669.29 2500,2822.83 2559.06,2881.89 2559.06,2968.5 2529.53,2998.03 2510.82,3016.74 U3.A5@2507.87,3016.73 ; v1(2492.13,3377.95) 2468.5,3354.33 1917.32,3354.33 1893.7,3377.95 1799.21,3377.95 1783.46,3393.7 1783.46,3413.39 1803.15,3433.07 U6.16@1803.15,3452.76 U6.16@1803.15,3460.62 ; U10.17@2775.59,3452.76 2775.59,3472.44 2795.28,3492.13 2795.28,3507.87 2787.4,3515.75 2787.4,3535.43 v1(2807.09,3555.12)
  MidLayer1 w5: v1(2527.56,2996.06) 2507.87,2996.06 2488.19,3015.75 2440.94,3015.75 2429.13,3027.56 2429.13,3082.68 2417.32,3094.49 2397.64,3094.49 2389.76,3102.36 2389.76,3122.05 2401.57,3133.86 2417.32,3133.86 2429.13,3145.67 2429.13,3161.42 2440.94,3173.23 2492.13,3173.23 2515.75,3196.85 2728.35,3196.85 2799.21,3267.72 2799.21,3503.94 2787.4,3515.75 2787.4,3535.43 v1(2807.09,3555.12)
  MidLayer2 w5: v2(1677.17,3503.94) 1677.17,3433.07 1696.85,3413.39 1696.85,3397.64 1688.98,3389.76 1688.98,3322.83 v1(1720.47,3291.34)
  MidLayer4 w5: v2(1677.17,3503.94) 1720.47,3503.94 1744.09,3527.55 v2(1803.14,3527.55) ; v1(2492.13,3377.95) 2456.69,3377.95 2440.94,3393.7 2440.94,3413.39 2503.94,3476.38 2724.41,3476.38 v1@2805.12,3557.09
  Bottom Layer w5: U7.16@1677.17,3452.76 v2(1677.17,3503.94) ; RN1.7@1688.18,3291.34 v1(1720.47,3291.34) RN4.6@1779.53,3291.34 RN4.6@1779.92,3291.34 ; v1(2492.13,3377.95) U11.17@2492.13,3452.76
BUS_SDRAM_CKE: RN3.7 RN5.6 U4.G10 U6.37 U7.37 | length 3428.7
  Top Layer w5: v2(1866.14,3850.39) U6.37@1866.14,3901.57
  Top Layer w7.87: v1(1366.14,1751.97) U4.G10@1385.83,1732.28
  MidLayer3 w5: v2(1614.17,3948.82) 1614.17,3976.38 1618.9,3981.11 v1@1618.9,4015.75 ; v2(1866.14,3850.39) 1866.14,3818.9 1948.82,3736.22 2098.43,3736.22 2192.91,3641.73 v1(2192.91,3397.64)
  MidLayer4 w5: v1(1366.14,1751.97) 1385.83,1771.65 1492.13,1771.65 1507.87,1787.4 1507.87,1929.13 1535.43,1956.69 1535.43,2031.5 1535.43,2039.37 1535.43,2070.87 1555.12,2090.55 1555.12,2118.11 1728.35,2291.34 1728.35,2606.3 1814.96,2692.91 1814.96,2704.72 1913.39,2803.15 2090.55,2803.15 2129.92,2842.52 2129.92,3248.03 2192.91,3311.02 v1(2192.91,3397.64) ; v2(1614.17,3948.82) 1637.8,3972.44 1685.04,3972.44 1755.91,3901.57 1814.96,3901.57 v2(1866.14,3850.39)
  Bottom Layer w5: RN3.7@1586.22,4015.75 v1(1617.14,4015.75) RN5.6@1676.19,4015.75 RN5.6@1677.56,4015.75 ; U7.37@1614.17,3901.57 v2(1614.17,3948.82)